# Altium PCB sheet4.PcbDoc (part 1 of 3)
Units mm, origin at the board's own origin, x right, y up, seen from the top; angles counter-clockwise.
Board outline 48.25 x 36 mm, 2 copper layers (Top Layer, Bottom Layer); 112 components, 103 nets, 475 pads, 0 vias.
Unrouted connection lines stored in the file: 312.
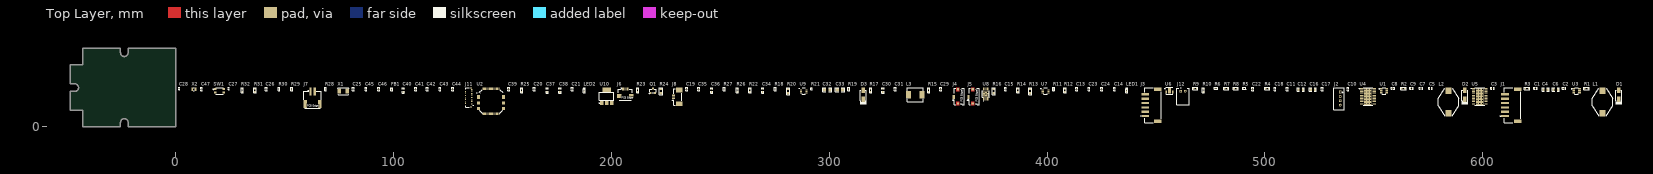
[diagram p0: Top Layer view]
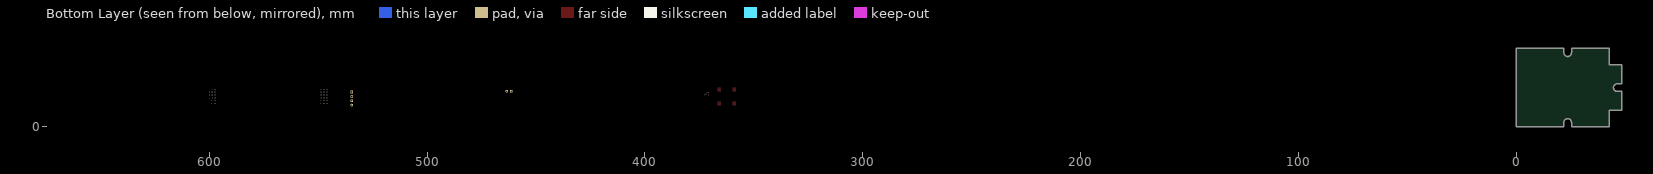
[diagram p1: Bottom Layer view, seen from below]

## Layer stack, top to bottom
Top Solder: solder mask 0.0102, Solder Resist, Dk 3.5
Top Layer: signal copper 0.0356
Dielectric 1: dielectric 0.32, FR-4, Dk 4.8
Bottom Layer: signal copper 0.0356
Bottom Solder: solder mask 0.0102, Solder Resist, Dk 3.5

## Board outline
-48.25,16.25 -46.25,16.25 ccw(c-46.25,18) -46.25,19.75 -48.25,19.75 -48.25,28.5 -42.5,28.5 -42.5,36 -25.25,36 -25.25,34 ccw(c-23.5,34) -21.75,34 -21.75,36 0,36 0,0 -21.75,0 -21.75,2 ccw(c-23.5,2) -25.25,2 -25.25,0 -42.5,0 -42.5,7.5 -48.25,7.5

## Design rules (kind name [scope] priority, off if disabled: settings)
Clearance [All] p1: gap=0.254 ignorepadtopadclearanceinfootprint=FALSE except(0: Arc-Hole Track-Hole SMDPad-Hole THPad-Hole Via-Hole Fill-Hole Poly-Hole Region-Hole Text-Hole)
DiffPairsRouting [All] p1: maxlimit=0.254 minlimit=0.254 mostfreqgap=0.254 toplayer_minwidth=0.381 toplayer_maxwidth=0.381 toplayer_prefwidth=0.381 bottomlayer_minwidth=0.381 bottomlayer_maxwidth=0.381 bottomlayer_prefwidth=0.381 maxuncoupledlength=12.7
MinimumSolderMaskSliver [All] p1 off: minsoldermaskwidth=0.254
PolygonConnect [All] p1: connectstyle=Relief reliefconductorwidth=0.254 reliefentries=4 polygonreliefangle="90 Angle" airgapwidth=0.254
RoomDefinition Sheet4 [InComponentClass('Sheet4')] p1: confinementstyle=ConfineIn formatcopy=TRUE lockcomponents=FALSE outline 1.157,1.524 663.97,1.524 663.97,20.828 1.157,20.828
RoutingVias [All] p1: holewidth=0.711 width=1.27 viastyle="Through Hole" minholewidth=0.711 minwidth=1.27 maxholewidth=0.711 maxwidth=1.27
SilkToSilkClearance [All] p1 off: silktosilkclearance=0.254
SilkToSolderMaskClearance [IsPad] p1 off: minsilkscreentomaskgap=0.254 clearancetoexposedcopper=TRUE
SolderMaskExpansion [All] p1: expansion=0.102 istentingtop=FALSE
Width [All] p1: maxlimit=0.254 minlimit=0.254 preferedwidth=0.254
26 further rules are at their usual default settings.

## Classes and differential pairs
differential pair USB_D: +USB_D_P -USB_D_N

## Components (designator, comment, footprint, x,y, rotation, side; value= is the part's Value field where it differs from the comment)
C1 "0.1uF" Cap-0402 624.092,17.653 r0 top value=100nF
C2 "0.1uF" Cap-0402 637.3,17.653 r0 top value=100nF
C3 "0.1uF" Cap-0402 604.407,17.653 r0 top value=100nF
C4 "22uF" Cap-0805 628.791,17.145 r0 top
C5 "1uF" Cap-0402 575.959,17.653 r0 top
C6 "22uF" Cap-0805 633.49,17.145 r0 top
C7 "1uF" Cap-0402 571.641,17.653 r0 top
C8 "0.1uF" Cap-0402 558.687,17.653 r0 top value=100nF
C9 "47nF" Cap-0402 567.323,17.653 r0 top
C10 "1uF" Cap-0402 538.113,17.272 r90 top
C11 "0.1uF" Cap-0402 510.173,17.272 r90 top value=100nF
C12 "22uF" Cap-0805 516.396,17.145 r0 top
C13 "0.1uF" Cap-0402 413.653,17.272 r90 top value=100nF
C14 "0.1uF" Cap-0402 430.925,17.272 r90 top value=100nF
C15 "0.1uF" Cap-0402 380.887,17.272 r90 top value=100nF
C16 "22uF" Cap-0805 521.984,17.145 r0 top
C17 "0.1uF" Cap-0402 526.302,17.272 r90 top value=100nF
C18 "1uF" Cap-0402 504.585,17.272 r90 top
C19 "0.1uF" Cap-0402 234.583,17.272 r90 top value=100nF
C20 "0.1uF" Cap-0402 164.606,17.272 r90 top value=100nF
C21 "0.1uF" Cap-0402 182.132,17.272 r90 top value=100nF
C22 "47nF" Cap-0402 494.425,17.272 r90 top
C23 "1uF" Cap-0402 419.241,17.272 r90 top
C24 "1uF" Cap-0402 425.083,17.272 r90 top
C25 "22PF" Cap-0402 81.548,17.272 r90 top value=22pF
C26 "22PF" Cap-0402 41.67,17.272 r90 top value=22pF
C27 "10pF" CAP-0201 24.398,17.526 r90 top
C28 "10pF" CAP-0201 1.665,17.526 r90 top
C29 "0.1uF" Cap-0402 351.169,17.272 r90 top value=100nF
C30 "10uF" Cap-0603 324.626,16.764 r90 top
C31 "0.1uF" Cap-0402 330.341,17.272 r90 top value=100nF
C32 "47uF" Cap-1206 299.099,17.018 r0 top
C33 "47uF" Cap-1206 304.941,17.018 r0 top
C34 "18pF" Cap-0603 269.508,16.764 r90 top
C35 "3nF" Cap-0402 240.171,17.272 r90 top
C36 "6.8nF" Cap-0603 246.14,16.764 r90 top
C37 "10uF" Cap-0603 170.575,16.764 r90 top
C38 "10uF" Cap-0603 176.417,16.764 r90 top
C39 "0.1uF" Cap-0402 152.922,17.272 r90 top value=100nF
C40 "10uF" Cap-0603 104.535,16.764 r90 top
C41 "0.1uF" Cap-0402 110.25,17.272 r90 top value=100nF
C42 "0.1uF" Cap-0402 115.584,17.272 r90 top value=100nF
C43 "0.1uF" Cap-0402 121.426,17.272 r90 top value=100nF
C44 "0.1uF" Cap-0402 127.268,17.272 r90 top value=100nF
C45 "1uF" Cap-0402 87.39,17.272 r90 top
C46 "0.1uF" Cap-0402 93.232,17.272 r90 top value=100nF
C47 "0.1uF" Cap-0402 11.952,17.272 r90 top value=100nF
D1 "SS34" SMA 662.319,14.732 r90 top
D2 "SS34" SMA 591.707,14.732 r90 top
D3 "SS36" SMA 315.609,14.732 r90 top
FB1 "BLM15PD121SN1D" IND-0402 99.201,17.272 r90 top
J1 "S6B-PH-SM4-TB(LF)(SN)" S6B-PH-SM4-TB(LF)(SN) 613.043,9.906 r90 top
J2 "440054-4" 440054-4 534.557,12.954 r90 top
J3 "S6B-PH-SM4-TB(LF)(SN)" S6B-PH-SM4-TB(LF)(SN) 447.943,9.906 r90 top
J4 "54548-0571" 54548-0571 359.043,10.668 r90 top
J5 "54548-0571" 54548-0571 365.901,10.668 r90 top
J6 "0.5-6PQFHY-H1.0 119" "0.5-6PQFHY-H1.0 119" 206.389,15.748 r0 top
J7 "WAFER-PH2.0-2PWB" WAFER-PH2.0-2PWB 62.879,13.335 r0 top
J8 "0533980271" 0533980271 231.281,10.541 r90 top
J11 "FH26W-25S-0.3SHW(60)" FH26W-25S-0.3SHW(60) 134.507,13.462 r90 top
J12 "S2B-PH-K-S(LF)(SN)" S2B-PH-K-S(LF)(SN) 461.405,16.383 r0 top
L1 "22uH" SSL0804T-220M-N 654.826,11.43 r90 top
L2 "22uH" SSL0804T-220M-N 584.214,11.43 r90 top
L3 "6.8uH" 0630CDMCCDS_6R8MC 339.485,14.732 r0 top
LED1 "Green" LED-0402 436.513,16.51 r90 top
LED2 "Red" LED-0402 187.593,16.51 r90 top
Q1 "NSS40201LT1G" SOT-23 219.089,16.51 r0 top
R1 "100K" Res-0603 647.587,17.526 r0 top
R2 "100K" Res-0603 563.513,17.526 r0 top
R3 "5.1K" Res-0603 620.282,17.526 r0 top
R4 "5.1K" Res-0603 501.029,17.526 r0 top
R5 "10K" Res-0402 490.488,17.653 r0 top
R6 "10K" Res-0402 477.534,17.653 r0 top
R7 "1.5K" Res-0603 482.233,17.526 r0 top value=1.5kR
R8 "1.5K" Res-0603 486.551,17.526 r0 top value=1.5kR
R9 "1.5K" Res-0603 468.009,17.526 r0 top value=1.5kR
R10 "1.5K" Res-0603 471.692,16.764 r90 top value=1.5kR
R11 "1K" Res-0402 402.985,17.272 r90 top
R12 "6.2K" Res-0603 408.192,16.764 r90 top value=6.2kR
R13 "10R" RES-0805 392.317,16.383 r90 top
R14 "0.1R" Res-0603 386.602,16.764 r90 top value=100mR
R15 "200K" Res-0603 345.708,16.764 r90 top
R16 "10R" RES-0805 375.553,16.383 r90 top
R17 "68K" Res-0603 319.038,16.764 r90 top
R18 "47R" Res-0402 275.223,17.272 r90 top
R19 "51K" Res-0402 309.005,17.272 r90 top value=51kR
R20 "10R" RES-0805 281.192,16.383 r90 top
R21 "23.7K" Res-0201 291.86,17.526 r90 top value=23.7kR
R22 "0.1R" Res-0603 263.666,16.764 r90 top value=100mR
R23 "100R" Res-0603 212.104,16.764 r90 top
R24 "10R" RES-0805 222.772,16.383 r90 top
R25 "330R" Res-0603 158.891,16.764 r90 top
R26 "169k" Res-0603 257.824,16.764 r90 top
R27 "10K" Res-0402 251.855,17.272 r90 top
R28 "806R" Res-0402 68.848,17.272 r90 top
R29 "10K" Res-0402 53.354,17.272 r90 top
R30 "10K" Res-0402 47.512,17.272 r90 top
R31 "DNP" Res-0603 36.463,16.764 r90 top
R32 "DNP" Res-0603 30.621,16.764 r90 top
SW1 "TS-1185EC-C-D-B" TS-1185EC-C-D-B_ 20.207,16.51 r0 top
U1 "MT3608" SOT-23-6 554.623,16.51 r0 top
U2 "STM32F103RCT6" "64-LQFP (10x10)" 144.794,11.684 r0 top
U3 "MT3608" SOT-23-6 643.015,16.51 r0 top
U4 "DRV8873HPWPRQ1" HTSSOP-24-EP 547.257,13.97 r0 top
U5 "DRV8873HPWPRQ1" HTSSOP-24-EP 598.565,13.97 r0 top
U6 "MCP73213-A6SI/MF" TDFN-10-EP(3x3) 456.198,16.51 r0 top
U7 "INA219AIDCNR" SOT-23-8 399.302,16.51 r0 top
U8 "TPS54240DGQR" 10-HVSSOP 371.87,15.113 r90 top
U9 "INA219AIDCNR" SOT-23-8 288.304,16.51 r0 top
U10 "AMS1117-3.3" "SOT- 223" 197.88,13.97 r0 top
X1 "8MHz" SMD5032-2P 76.976,16.383 r0 top
X2 "32.768KHZ" "2-SMD, (2.00mm x 1.20mm)" 8.396,17.272 r0 top

## Footprints (in the part's own frame and the unit in brackets; to place one, negate y for a bottom-side part, rotate by r counter-clockwise, add the part's x,y. Pads: shape width x height; smd on the part's side, far side on the other; paste and mask are expansions set on the pad)
"0.5-6PQFHY-H1.0 119" [mm]
  rect 0.3x1.2 smd: 1(-1.25,1.625) 2(-0.75,1.625) 3(-0.25,1.625) 4(0.25,1.625) 5(0.75,1.625) 6(1.25,1.625)
  rect 2x1.8 smd: MP1(-2.75,-1.625) MP2(2.75,-1.625)
  silkscreen extent -3.3,-3.45 3.3,2.13, body extent -3.25,-3.43 3.25,2.26, height 1.2
"2-SMD, (2.00mm x 1.20mm)" [mm]
  rect 0.8x1.5 smd: 1(-0.75,0) 2(0.75,0)
  silkscreen extent -0.15,-0.66 0.18,0.66, body extent -1,-0.6 1,0.6, height 0.35
10-HVSSOP [mm] "IC BATT CHG LI-ION 1CELL 10MSOP"
  rect 1.45x0.3 smd: 1(-2.2,1) 2(-2.2,0.5) 3(-2.2,0) 4(-2.2,-0.5) 5(-2.2,-1) 6(2.2,-1) 7(2.2,-0.5) 8(2.2,0) 9(2.2,0.5) 10(2.2,1)
  round 0.45 hole 0.3: 11(-0.6,0.9) 11(-0.6,-0.9) 11(0,0) 11(0.6,0.9) 11(0.6,-0.9)
  rect 2.2x3.1 smd: 11(0,0)
  silkscreen extent -3.23,-1.64 1.48,1.64, body extent -2.45,-1.5 2.45,1.5, height 1.1
"64-LQFP (10x10)" [mm]
  rect 1.2x0.3 smd: 1(-5.75,3.75) 2(-5.75,3.25) 3(-5.75,2.75) 4(-5.75,2.25) 5(-5.75,1.75) 6(-5.75,1.25) 7(-5.75,0.75) 8(-5.75,0.25) 9(-5.75,-0.25) 10(-5.75,-0.75) 11(-5.75,-1.25) 12(-5.75,-1.75) 13(-5.75,-2.25) 14(-5.75,-2.75) 15(-5.75,-3.25) 16(-5.75,-3.75) 33(5.75,-3.75) 34(5.75,-3.25) 35(5.75,-2.75) 36(5.75,-2.25) 37(5.75,-1.75) 38(5.75,-1.25) 39(5.75,-0.75) 40(5.75,-0.25) 41(5.75,0.25) 42(5.75,0.75) 43(5.75,1.25) 44(5.75,1.75) 45(5.75,2.25) 46(5.75,2.75) 47(5.75,3.25) 48(5.75,3.75)
  rect 0.3x1.2 smd: 17(-3.75,-5.75) 18(-3.25,-5.75) 19(-2.75,-5.75) 20(-2.25,-5.75) 21(-1.75,-5.75) 22(-1.25,-5.75) 23(-0.75,-5.75) 24(-0.25,-5.75) 25(0.25,-5.75) 26(0.75,-5.75) 27(1.25,-5.75) 28(1.75,-5.75) 29(2.25,-5.75) 30(2.75,-5.75) 31(3.25,-5.75) 32(3.75,-5.75) 49(3.75,5.75) 50(3.25,5.75) 51(2.75,5.75) 52(2.25,5.75) 53(1.75,5.75) 54(1.25,5.75) 55(0.75,5.75) 56(0.25,5.75) 57(-0.25,5.75) 58(-0.75,5.75) 59(-1.25,5.75) 60(-1.75,5.75) 61(-2.25,5.75) 62(-2.75,5.75) 63(-3.25,5.75) 64(-3.75,5.75)
  silkscreen extent -6.63,-5.36 5.28,5.36, body extent -6,-6 6,6, height 1.6
0630CDMCCDS_6R8MC [mm]
  rect 2.35x3.5 smd: 1(-3.025,0) 2(3.025,0)
  silkscreen extent -3.71,-3.3 3.71,3.3, body extent -3.65,-3.3 3.65,3.3, height 3
54548-0571 [mm]
  rect 0.3x1 smd: 1(2.275,1.9) 2(2.775,1.9) 3(3.275,1.9) 4(3.775,1.9) 5(4.275,1.9)
  rect 1x1 smd: MP1(0,0) MP2(6.55,0)
  Top Layer region: 7.375,0.65 5.725,0.65 5.725,-0.65 7.375,-0.65
  Top Layer region: -0.825,0.65 0.825,0.65 0.825,-0.65 -0.825,-0.65
  silkscreen extent -0.58,-2.9 7.12,2.44, body extent -0.58,-2.9 7.12,2.1, height 1.21
440054-4 [mm]
  rect 1.3x1.3 hole 0.8: 1(3,0)
  round 1.3 hole 0.8: 2(1,0) 3(-1,0) 4(-3,0)
  silkscreen extent -5.05,-1.77 5.05,3.05, body extent -5,-1.72 5,2.99, height 6.35
0533980271 [mm]
  rect 0.8x1.3 smd: 1(2.55,2.75) 2(3.8,2.75)
  rect 2.1x3 smd: MP1(0,0) MP2(6.35,0)
  silkscreen extent -0.65,-1.1 7,3.23, body extent -0.65,-1.11 7,3.09, height 4.72
CAP-0201 [mm]
  rect 0.3x0.3 smd mask+0.055: 1(-0.3,0) 2(0.3,0)
  silkscreen extent -0.53,-0.23 0.53,0.23, body extent -0.3,-0.15 0.3,0.15, height 0.28
Cap-0402 [mil]
  rect 18x25 smd mask+2.36: 1(-18.5,0) 2(18.5,0)
  silkscreen extent -31,-16 31,16, body extent -20,-10 20,10, height 19
Cap-0603 [mil]
  rect 30x35 smd mask+2.36: 1(-30,0) 2(30,0)
  silkscreen extent -49,-21 49,21, body extent -32,-16 31,16, height 34
Cap-0805 [mil] "SMD 0805"
  rect 40x60 smd mask+2.76: 1(-40,0) 2(40,0)
  silkscreen extent -64,-34 64,34, body extent -39,-25 39,25, height 30
Cap-1206 [mil] "SMD 1206"
  rect 60x70 smd: 1(-50,0) 2(50,0)
  silkscreen extent -84,-39 84,39, body extent -63,-31 63,32, height 39
FH26W-25S-0.3SHW(60) [mm]
  rect 0.3x0.8 smd paste-1: 1(-3.6,-1.438) 3(-3,-1.438) 5(-2.4,-1.438) 7(-1.8,-1.438) 9(-1.2,-1.438) 11(-0.6,-1.438) 13(0,-1.438) 15(0.6,-1.438) 17(1.2,-1.438) 19(1.8,-1.438) 21(2.4,-1.438) 23(3,-1.438) 25(3.6,-1.438)
  rect 0.3x0.65 smd paste-1: 2(-3.3,1.438) 4(-2.7,1.438) 6(-2.1,1.438) 8(-1.5,1.438) 10(-0.9,1.438) 12(-0.3,1.438) 14(0.3,1.438) 16(0.9,1.438) 18(1.5,1.438) 20(2.1,1.438) 22(2.7,1.438) 24(3.3,1.438)
  rect 0.4x0.95 smd paste-1: MP1(-4.3,-1.162) MP2(4.3,-1.162)
  silkscreen extent -4.5,-2.18 4.5,1.31, body extent -4.5,-1.78 4.5,1.72, height 0.97
HTSSOP-24-EP [mm]
  rect 1.57x0.41 smd: 1(-2.87,3.575) 2(-2.87,2.925) 3(-2.87,2.275) 4(-2.87,1.625) 5(-2.87,0.975) 6(-2.87,0.325) 7(-2.87,-0.325) 8(-2.87,-0.975) 9(-2.87,-1.625) 10(-2.87,-2.275) 11(-2.87,-2.925) 12(-2.87,-3.575) 13(2.87,-3.575) 14(2.87,-2.925) 15(2.87,-2.275) 16(2.87,-1.625) 17(2.87,-0.975) 18(2.87,-0.325) 19(2.87,0.325) 20(2.87,0.975) 21(2.87,1.625) 22(2.87,2.275) 23(2.87,2.925) 24(2.87,3.575)
  rect 3.4x7.8 smd: 25(0,0)
  round 0.5 hole 0.3: P1(-1.3,3.25) P2(0,3.25) P3(1.3,3.25) P4(-1.3,1.95) P5(0,1.95) P6(1.3,1.95) P7(-1.3,0.65) P8(0,0.65) P9(1.3,0.65) P10(-1.3,-0.65) P11(0,-0.65) P12(1.3,-0.65) P13(-1.3,-1.95) P14(0,-1.95) P15(1.3,-1.95) P16(-1.3,-3.25) P17(0,-3.25) P18(1.3,-3.25)
  silkscreen extent -3.94,-4.05 2.25,4.05, body extent -3.2,-3.9 3.2,3.9, height 1.2
IND-0402 [mm]
  rect 0.4x0.6 smd: 1(-0.35,0) 2(0.35,0)
  silkscreen extent -0.71,-0.46 0.71,0.46, body extent -0.5,-0.25 0.5,0.25, height 0.25
LED-0402 [mm]
  rect 0.62x0.72 smd: 1(-0.475,0) 2(0.475,0)
  silkscreen extent -0.89,-0.51 1.55,0.51, body extent -0.5,-0.25 0.51,0.25, height 0.45
Res-0201 [mm]
  rect 0.27x0.37 smd mask+0.055: 1(-0.275,0) 2(0.275,0)
  silkscreen extent -0.48,-0.25 0.48,0.25, body extent -0.3,-0.15 0.3,0.15, height 0.29
Res-0402 [mil]
  rect 18x25 smd mask+2.17: 1(-18.5,0) 2(18.5,0)
  silkscreen extent -32,-17 32,16, body extent -23,-11 23,11, height 16
Res-0603 [mil]
  rect 30x35 smd: 1(-30,0) 2(30,0)
  silkscreen extent -48,-21 48,21, body extent -31,-17 31,17, height 18
RES-0805 [mil] "SMD 0805"
  rect 40x50 smd: 1(-40,0) 2(40,0)
  silkscreen extent -64,-29 64,29, body extent -39,-25 39,24, height 24
S2B-PH-K-S(LF)(SN) [mm]
  rect 1.2x1.2 hole 0.7: 1(0,0)
  round 1.2 hole 0.7: 2(2,0)
  silkscreen extent -1.95,-6.25 3.95,1.57, body extent -1.95,-6.25 3.95,1.35, height 4.8
S6B-PH-SM4-TB(LF)(SN) [mm]
  rect 1x3.5 smd: 1(-5,2.875) 2(-3,2.875) 3(-1,2.875) 4(1,2.875) 5(3,2.875) 6(5,2.875)
  rect 1.5x3.4 smd: MP1(-7.35,-2.875) MP2(7.35,-2.875)
  silkscreen extent -7.95,-4.37 7.95,5, body extent -7.95,-4.38 7.95,4.22, height 5.6
SMA [mm]
  rect 2.5x1.7 smd: 1(-2,0) 2(2,0)
  silkscreen extent -4.45,-1.42 2.06,1.42, body extent -2.6,-1.3 2.6,1.3, height 2.4
SMD5032-2P [mm]
  rect 1.7x2.4 smd: 1(-1.85,0) 2(1.85,0)
  silkscreen extent -2.51,-1.65 2.51,1.65, body extent -2.5,-1.6 2.5,1.6, height 1.3
SOT-23 [mm] "TRANS NPN 40V 0.6A SOT23"
  rect 0.82x0.92 smd: 1(-0.95,-1) 2(0.95,-1) 3(0,1)
  silkscreen extent -1.68,-1.3 1.55,0.81, body extent -1.5,-1.25 1.5,1.25, height 1.05
SOT-23-6 [mm]
  rect 1.22x0.62 smd: 1(-1.31,0.95) 2(-1.31,0) 3(-1.31,-0.95) 4(1.31,-0.95) 5(1.31,0) 6(1.31,0.95)
  silkscreen extent -2.18,-1.52 0.86,1.52, body extent -1.5,-1.5 1.5,1.5, height 1.47
SOT-23-8 [mm]
  rect 1x0.4 smd: 1(-1.295,0.975) 2(-1.295,0.325) 3(-1.295,-0.325) 4(-1.295,-0.975) 5(1.295,-0.975) 6(1.295,-0.325) 7(1.295,0.325) 8(1.295,0.975)
  silkscreen extent -2.11,-1.5 0.76,1.5, body extent -1.48,-1.45 1.48,1.45, height 1.1
"SOT- 223" [mm]
  rect 1.5x2 smd: 1(-2.3,-3.05) 2(0,-3.05) 3(2.3,-3.05)
  rect 3.8x2 smd: 4(0,3.05)
  silkscreen extent -3.35,-3.2 3.3,1.8, body extent -3.25,-3.5 3.25,3.5, height 1.61
SSL0804T-220M-N [mm]
  rect 2.92x2.79 smd: 1(-5.145,0) 2(5.145,0)
  silkscreen extent -6.27,-4.7 6.27,4.7, body extent -6.48,-4.7 6.48,4.7, height 4.9
TDFN-10-EP(3x3) [mm]
  rect 0.65x0.3 smd: 1(-1.55,1) 2(-1.55,0.5) 3(-1.55,0) 4(-1.55,-0.5) 5(-1.55,-1) 6(1.55,-1) 7(1.55,-0.5) 8(1.55,0) 9(1.55,0.5) 10(1.55,1)
  rect 1.55x2.48 smd: 11(0,0)
  silkscreen extent -2.16,-1.55 1.55,1.55, body extent -1.5,-1.5 1.5,1.5, height 1
TS-1185EC-C-D-B_ [mm]
  rect 1.25x0.9 smd: 1(-1.925,0.75) 1(1.925,0.75) 2(-1.925,-0.75) 2(1.925,-0.75)
  silkscreen extent -2.84,-1.52 1.78,1.52, body extent -2.33,-1.5 2.32,1.5, height 2
WAFER-PH2.0-2PWB [mm]
  rect 1x3.5 smd: 1(-1,2.85) 2(1,2.85)
  rect 1.5x3.5 smd: MP1(-3.35,-2.85) MP2(3.35,-2.85)
  silkscreen extent -4.09,-4.85 4.04,3.56, body extent -4.03,-4.8 3.97,3.7, height 5.59

## Part data
C1 C2 C3 C8 C11 C13 C14 C15 C17 C19 C20 C21 C29 C31 C39 C41 C42 C43 C44 C46 C47: library part GRM155R71C104KA88D, "CAP CER 0.1UF 16V X7R 0402", Case Code (Imperial)=0402, Case Code (Metric)=1005, Dielectric=X7R, Dielectric Material=Ceramic, Insulation Resistance=10GR, LCSC Part Number=C71629, Manufacturer=Murata, Max Operating Temperature=125°C, Min Operating Temperature=-55°C, Package Quantity=1, Tolerance=10%, Voltage=16V, Case/Package=0402, Category="Ceramic Capacitors", ComponentLink1Description=https://datasheet.ciiva.com/129/grm155r71c104ka88-01-129739.pdf?src-supplier=Digi-Key, ComponentLink1URL=https://datasheet.ciiva.com/129/grm155r71c104ka88-01-129739.pdf?src-supplier=Digi-Key, ComponentLink2Description=https://datasheet.ciiva.com/129/grm155r71c104ka88-01-129740.pdf?src-supplier=Digi-Key, ComponentLink2URL=https://datasheet.ciiva.com/129/grm155r71c104ka88-01-129740.pdf?src-supplier=Digi-Key, ComponentLink3Description=https://datasheet.ciiva.com/18102/getdatasheetpartid-85307-18102905.pdf?src-supplier=Verical, ComponentLink3URL=https://datasheet.ciiva.com/18102/getdatasheetpartid-85307-18102905.pdf?src-supplier=Verical, ComponentLink4Description=https://datasheet.ciiva.com/29199/454098-da-01-en-vs-kondensator-0402-29199799.pdf?src-supplier=Conrad, ComponentLink4URL=https://datasheet.ciiva.com/29199/454098-da-01-en-vs-kondensator-0402-29199799.pdf?src-supplier=Conrad, ComponentLink5Description=https://datasheet.ciiva.com/7937/4360-7937615.pdf?src-supplier=Element14, ComponentLink5URL=https://datasheet.ciiva.com/7937/4360-7937615.pdf?src-supplier=Element14, ComponentLink6Description=https://datasheet.ciiva.com/14116/grmseries-highdielectrictype-eng-14116878.pdf?src-supplier=Distrelec, ComponentLink6URL=https://datasheet.ciiva.com/14116/grmseries-highdielectrictype-eng-14116878.pdf?src-supplier=Distrelec, ComponentLink7Description=https://datasheet.ciiva.com/14103/grmseries-highdielectrictype-eng-14103750.pdf?src-supplier=Distrelec, ComponentLink7URL=https://datasheet.ciiva.com/14103/grmseries-highdielectrictype-eng-14103750.pdf?src-supplier=Distrelec, ComponentLink8Description=https://datasheet.ciiva.com/28534/4360-28534127.pdf?src-supplier=Element14, ComponentLink8URL=https://datasheet.ciiva.com/28534/4360-28534127.pdf?src-supplier=Element14, ComponentLink9Description=https://datasheet.ciiva.com/28534/4360-28534133.pdf?src-supplier=Element14, ComponentLink9URL=https://datasheet.ciiva.com/28534/4360-28534133.pdf?src-supplier=Element14, ComponentLink10Description=https://datasheet.ciiva.com/16199/product-16199000.pdf?src-supplier=Future+Electronics, ComponentLink10URL=https://datasheet.ciiva.com/16199/product-16199000.pdf?src-supplier=Future+Electronics, Depth=0.5mm, Height=0.5mm, Item Type=Capacitor, Lead Free="Lead Free", Length=1mm, Manufacturer Part Number=GRM155R71C104KA88D, Material=Ceramic, Mounting Technology="Surface Mount", Packaging="Tape and Reel", Pins=2, Pricing 1="10000=0.00480, 30000=0.00470, 100000=0.00350, 250000=0.00330 (USD)", Radiation Hardening=No, RoHS=Yes, RoHS Compliant=Yes, Series=GRM, Stock 1=1690322, Supplier 1="Arrow Electronics", Supplier Part Number 1=GRM155R71C104KA88D, Termination=SMD/SMT, Thickness=0.022inch, Voltage Rating=16V, Voltage Rating (DC)=16V, Width=0.02inch
C4 C6 C12 C16: library part CC0805MKX5R8BB226, "CAP CER 22UF 25V X5R 0805", Case Code (Imperial)=0805, Case Code (Metric)=2012, Dielectric=X5R, LCSC Part Number=C784585, Manufacturer=Yageo, Max Operating Temperature=85°C, Min Operating Temperature=-55°C, Package Quantity=3000, Supplier Part Number 1=311-1903-1-ND, Tolerance=20%, Voltage Rating=25V, Capacitance=22uF, Case/Package=0805, Category="Ceramic Capacitors", ComponentLink1Description=http://www.mouser.com/ds/2/447/Yageo_UPY-GP_NP0_16V-to-50V_9-358835.pdf?src-supplier=Mouser, ComponentLink1URL=http://www.mouser.com/ds/2/447/Yageo_UPY-GP_NP0_16V-to-50V_9-358835.pdf?src-supplier=Mouser, ComponentLink2Description=http://www.yageo.com/documents/recent/UPY-GPHC_X5R_4V-to-50V_25.pdf?src-supplier=Digi-Key, ComponentLink2URL=http://www.yageo.com/documents/recent/UPY-GPHC_X5R_4V-to-50V_25.pdf?src-supplier=Digi-Key, Halogen Free="Halogen Free", Height=1.25mm, Item Type=Capacitor, Lead Free="Lead Free", Length=0.079inch, Manufacturer Part Number=CC0805MKX5R8BB226, Mount="Surface Mount", Packaging="Tape and Reel", Pricing 1="1=0.47000, 10=0.33300, 50=0.25140, 100=0.21900, 500=0.16222, 1000=0.13789 (USD)", RoHS=Yes, RoHS Compliant=Yes, Stock 1=64970, Supplier 1=Digi-Key, Termination=SMD/SMT, Thickness=0.057inch, Voltage Rating (DC)=25V, Weight=0.000194oz, Width=0.049inch
C5 C7 C10 C18 C23 C24 C45: library part CC0402KRX5R7BB105, "CAP CER 1UF 16V X5R 0402", Case Code (Imperial)=0402, Case Code (Metric)=1005, Dielectric=X5R, LCSC Part Number=C325464, Manufacturer=Yageo, Max Operating Temperature=85°C, Min Operating Temperature=-55°C, Supplier Part Number 1=311-1691-6-ND, Tolerance=10%, Voltage Rating=16V, Capacitance=1uF, Case/Package=0402, ComponentLink1Description=http://www.yageo.com/documents/recent/UPY-GPHC_X5R_4V-to-50V_12.pdf?src-supplier=Avnet+Europe, ComponentLink1URL=http://www.yageo.com/documents/recent/UPY-GPHC_X5R_4V-to-50V_12.pdf?src-supplier=Avnet+Europe, Composition=Ceramic, Depth=0.5mm, Halogen Free="Halogen Free", Height=0.5mm, Item Type=Capacitor, Lead Free="Lead Free", Length=1mm, Manufacturer Part Number=CC0402KRX5R7BB105, Mount="Surface Mount", Packaging="Tape and Reel", Pricing 1="1=0.36, 10=0.252, 100=0.1512, 500=0.1134, 1000=0.09576, 2500=0.09072, 5000=0.08568 (USD)", Radiation Hardening=No, Stock 1=1405667, Supplier 1=Digi-Key, Termination=SMD/SMT, Thickness=0.022inch, Voltage Rating (DC)=16V, Weight=2.3E-05oz, Width=0.02inch
C9 C22: library part GRM155R71E473KA88D, "CAP CER 0.047UF 25V X7R 0402", Case Code (Imperial)=0402, Case Code (Metric)=1005, Dielectric=X7R, LCSC Part Number=C77017, Manufacturer=Murata, Max Operating Temperature=125°C, Min Operating Temperature=-55°C, Package Quantity=1, Supplier Part Number 1=2478015P, Tolerance=10%, Voltage=25V, Case/Package=0402, Category="Ceramic Capacitors", ComponentLink1Description=https://datasheet.ciiva.com/34302/1856425-34302854.pdf?src-supplier=Jameco, ComponentLink1URL=https://datasheet.ciiva.com/34302/1856425-34302854.pdf?src-supplier=Jameco, ComponentLink2Description=https://datasheet.ciiva.com/131/grm155r71e473ka88-01-131494.pdf?src-supplier=Digi-Key, ComponentLink2URL=https://datasheet.ciiva.com/131/grm155r71e473ka88-01-131494.pdf?src-supplier=Digi-Key, ComponentLink3Description=https://datasheet.ciiva.com/18184/getdatasheetpartid-153136-18184712.pdf?src-supplier=Verical, ComponentLink3URL=https://datasheet.ciiva.com/18184/getdatasheetpartid-153136-18184712.pdf?src-supplier=Verical, ComponentLink4Description=https://datasheet.ciiva.com/29199/454180-da-01-en-vs-kondensator-0402-29199826.pdf?src-supplier=Conrad, ComponentLink4URL=https://datasheet.ciiva.com/29199/454180-da-01-en-vs-kondensator-0402-29199826.pdf?src-supplier=Conrad, ComponentLink5Description=https://datasheet.ciiva.com/14103/grmseries-highdielectrictype-eng-14103754.pdf?src-supplier=Distrelec, ComponentLink5URL=https://datasheet.ciiva.com/14103/grmseries-highdielectrictype-eng-14103754.pdf?src-supplier=Distrelec, ComponentLink6Description=https://datasheet.ciiva.com/7937/608985-7937623.pdf?src-supplier=Element14, ComponentLink6URL=https://datasheet.ciiva.com/7937/608985-7937623.pdf?src-supplier=Element14, ComponentLink7Description=https://datasheet.ciiva.com/131/grm155r71e473ka88-01-131493.pdf?src-supplier=Digi-Key, ComponentLink7URL=https://datasheet.ciiva.com/131/grm155r71e473ka88-01-131493.pdf?src-supplier=Digi-Key, ComponentLink8Description=https://datasheet.ciiva.com/131/grm155r71e473ka88-01-131492.pdf?src-supplier=Digi-Key, ComponentLink8URL=https://datasheet.ciiva.com/131/grm155r71e473ka88-01-131492.pdf?src-supplier=Digi-Key, ComponentLink9Description=https://datasheet.ciiva.com/5424/product-5424844.pdf?src-supplier=Mouser, ComponentLink9URL=https://datasheet.ciiva.com/5424/product-5424844.pdf?src-supplier=Mouser, ComponentLink10Description=https://datasheet.ciiva.com/2989/product-2989395.pdf?src-supplier=Avnet, ComponentLink10URL=https://datasheet.ciiva.com/2989/product-2989395.pdf?src-supplier=Avnet, ComponentLink11Description=https://datasheet.ciiva.com/16213/product-16213823.pdf?src-supplier=Future+Electronics, ComponentLink11URL=https://datasheet.ciiva.com/16213/product-16213823.pdf?src-supplier=Future+Electronics, Construction=Flat, Depth=0.5mm, Height=0.5mm, Item Type=Capacitor, Lead Free="Lead Free", Length=1mm, Manufacturer Part Number=GRM155R71E473KA88D, Material=Ceramic, Mounting Technology="Surface Mount", Packaging="Tape and Reel", Pins=2, Pricing 1="1000=0.00007, 8000=0.00900 (GBP)", Radiation Hardening=No, Reach SVHC Compliant=Yes, RoHS=Yes, RoHS Compliant=Yes, Series=GRM, Stock 1=10000, Supplier 1=Rs, Termination=SMD/SMT, Thickness=0.022inch, Voltage Rating=25V, Voltage Rating (DC)=25V, Width=0.02inch
C25 C26: library part CC0402JRNPO9BN220, "CAP CER 22PF 50V C0G/NPO 0402", Case Code (Imperial)=0402, Case Code (Metric)=1005, Dielectric=C0G, Dielectric Material=Ceramic, Insulation Resistance=100GR, LCSC Part Number=C106203, Manufacturer=Yageo, Max Operating Temperature=125°C, Min Operating Temperature=-55°C, Package Quantity=1, Supplier Part Number 1=9105957, Temperature Coefficient=30ppm/°C, Tolerance=5%, Voltage=50V, Case/Package=0402, Category="Ceramic Capacitors", ComponentLink1Description=https://datasheet.ciiva.com/5789/1443161-5789509.pdf?src-supplier=Farnell, ComponentLink1URL=https://datasheet.ciiva.com/5789/1443161-5789509.pdf?src-supplier=Farnell, ComponentLink2Description=https://datasheet.ciiva.com/8033/1443161-8033606.pdf?src-supplier=Element14, ComponentLink2URL=https://datasheet.ciiva.com/8033/1443161-8033606.pdf?src-supplier=Element14, ComponentLink3Description=https://datasheet.ciiva.com/7656/1132289-7656615.pdf?src-supplier=Element14, ComponentLink3URL=https://datasheet.ciiva.com/7656/1132289-7656615.pdf?src-supplier=Element14, ComponentLink4Description=https://datasheet.ciiva.com/8033/1443161-8033607.pdf?src-supplier=Element14, ComponentLink4URL=https://datasheet.ciiva.com/8033/1443161-8033607.pdf?src-supplier=Element14, ComponentLink5Description=https://datasheet.ciiva.com/8033/1443161-8033605.pdf?src-supplier=Element14, ComponentLink5URL=https://datasheet.ciiva.com/8033/1443161-8033605.pdf?src-supplier=Element14, ComponentLink6Description=https://datasheet.ciiva.com/143/mlccorderingcode-143987.pdf?src-supplier=Digi-Key, ComponentLink6URL=https://datasheet.ciiva.com/143/mlccorderingcode-143987.pdf?src-supplier=Digi-Key, ComponentLink7Description=https://datasheet.ciiva.com/143/mlccorderingcode-143986.pdf?src-supplier=Digi-Key, ComponentLink7URL=https://datasheet.ciiva.com/143/mlccorderingcode-143986.pdf?src-supplier=Digi-Key, ComponentLink8Description=https://datasheet.ciiva.com/143/mlccorderingcode-143988.pdf?src-supplier=Digi-Key, ComponentLink8URL=https://datasheet.ciiva.com/143/mlccorderingcode-143988.pdf?src-supplier=Digi-Key, ComponentLink9Description=https://datasheet.ciiva.com/5425/upy-gp-np0-16v-to-50v-8-5425483.pdf?src-supplier=Mouser, ComponentLink9URL=https://datasheet.ciiva.com/5425/upy-gp-np0-16v-to-50v-8-5425483.pdf?src-supplier=Mouser, ComponentLink10Description=https://datasheet.ciiva.com/15189/getdatasheetpartid-370074-15189117.pdf?src-supplier=Verical, ComponentLink10URL=https://datasheet.ciiva.com/15189/getdatasheetpartid-370074-15189117.pdf?src-supplier=Verical, Depth=0.5mm, Height=0.5mm, Item Type=Capacitor, Lead Free="Lead Free", Length=1mm, Manufacturer Part Number=CC0402JRNPO9BN220, Mounting Technology="Surface Mount", Packaging="Tape and Reel", Pins=2, Pricing 1="10000=0.00220, 40000=0.00210, 150000=0.00200, 400000=0.00190, 1000000=0.00180 (USD)", Radiation Hardening=No, Reach SVHC Compliant=Yes, Resistor Type=Ceramic, RoHS=Yes, RoHS Compliant=Yes, Series=CC, Stock 1=200000, Supplier 1="Future Electronics", Termination=SMD/SMT, Thickness=0.022inch, Voltage Rating=50V, Voltage Rating (DC)=50V, Width=0.02inch
C27 C28: library part CGA1A2C0G1E100D030BA, "CAP CER 10PF 25V C0G 0201", Case Code (Imperial)=0201, Case Code (Metric)=0603, Dielectric=C0G, LCSC Part Number=C2168728, Manufacturer=TDK, Max Operating Temperature=125°C, Min Operating Temperature=-55°C, Package Quantity=1, Ratings=AEC-Q200, Resistor Type=Ceramic, Supplier Part Number 1=445-9023-1-ND, Voltage Rating=25V, Capacitance=10pF, Case/Package=0201, Category="Ceramic Capacitors", ComponentLink1Description=https://datasheet.ciiva.com/24220/cga1a2c0g1e100d030ba-271838-24220873.pdf?src-supplier=Mouser, ComponentLink1URL=https://datasheet.ciiva.com/24220/cga1a2c0g1e100d030ba-271838-24220873.pdf?src-supplier=Mouser, Depth=0.3mm, Height=0.3mm, Length=0.6mm, Manufacturer Part Number=CGA1A2C0G1E100D030BA, Mount="Surface Mount", Packaging="Tape and Reel", Pricing 1="1=0.11000, 10=0.07900, 50=0.04340, 100=0.03540, 500=0.02530, 1000=0.01987, 2500=0.01807, 5000=0.01662 (USD)", RoHS=Yes, RoHS Compliant=Yes, Series=CGA, Stock 1=28695, Supplier 1=Digi-Key, Termination=SMD/SMT, Thickness=0.013inch, Voltage Rating (DC)=25V, Weight=6E-06oz, Width=0.3mm
C30 C37 C38 C40: library part CC0603KRX5R7BB106, "CAP CER 10UF 16V X5R 0603", Case Code (Imperial)=0603, Case Code (Metric)=1608, LCSC Part Number=C2936601, Manufacturer=Yageo, Max Operating Temperature=85°C, Min Operating Temperature=-55°C, Supplier Part Number 1=311-3486-1-ND, Tolerance=10%, Voltage Rating=16V, Capacitance=10uF, Case/Package=0603, Category="Ceramic Capacitors", ComponentLink1Description=http://www.yageo.com/documents/recent/UPY-GPHC_X5R_4V-to-50V_25.pdf?src-supplier=Digi-Key, ComponentLink1URL=http://www.yageo.com/documents/recent/UPY-GPHC_X5R_4V-to-50V_25.pdf?src-supplier=Digi-Key, Item Type=Capacitor, Manufacturer Part Number=CC0603KRX5R7BB106, Mount="Surface Mount", Packaging="Cut Tape", Pricing 1="1=0.68000, 10=0.48000, 50=0.36300, 100=0.31610, 500=0.23416, 1000=0.19903 (USD)", RoHS=Yes, RoHS Compliant=Yes, Stock 1=240725, Supplier 1=Digi-Key
C32 C33: library part GRM31CR61E476ME44L, "CAP CER 47UF 25V X5R 1206", Dielectric=X5R, LCSC Part Number=C403725, Manufacturer=Murata, Supplier Part Number 1=490-16268-2-ND, Tolerance=20%, Voltage Rating (DC)=25V, Capacitance=47uF, Category="Ceramic Capacitors", ComponentLink1Description=https://search.murata.co.jp/Ceramy/image/img/A01X/partnumbering_e_01.pdf?src-supplier=Digi-Key, ComponentLink1URL=https://search.murata.co.jp/Ceramy/image/img/A01X/partnumbering_e_01.pdf?src-supplier=Digi-Key, Item Type=Capacitor, Length=3.2mm, Manufacturer Part Number=GRM31CR61E476ME44L, RoHS=Yes, Supplier 1=Digi-Key, Thickness=1.6mm, Width=1.6mm
C34: library part CC0603JRNPO9BN180, "CAP CER 18PF 50V C0G/NPO 0603", Case Code (Imperial)=0603, Case Code (Metric)=1608, Dielectric=C0G, Insulation Resistance=100GR, LCSC Part Number=C107040, Manufacturer=Yageo, Max Operating Temperature=125°C, Min Operating Temperature=-55°C, Package Quantity=1, Resistor Type=Ceramic, Supplier Part Number 1=311-1061-6-ND, Temperature Coefficient=30ppm/°C, Tolerance=5%, Voltage Rating=50V, Capacitance=18pF, Case/Package=0603, Category="Ceramic Capacitors", ComponentLink1Description=https://datasheet.ciiva.com/144/mlccorderingcode-144638.pdf?src-supplier=Digi-Key, ComponentLink1URL=https://datasheet.ciiva.com/144/mlccorderingcode-144638.pdf?src-supplier=Digi-Key, ComponentLink2Description=https://datasheet.ciiva.com/144/mlccorderingcode-144637.pdf?src-supplier=Digi-Key, ComponentLink2URL=https://datasheet.ciiva.com/144/mlccorderingcode-144637.pdf?src-supplier=Digi-Key, ComponentLink3Description=https://datasheet.ciiva.com/144/mlccorderingcode-144639.pdf?src-supplier=Digi-Key, ComponentLink3URL=https://datasheet.ciiva.com/144/mlccorderingcode-144639.pdf?src-supplier=Digi-Key, ComponentLink4Description=https://datasheet.ciiva.com/28450/1443161-28450477.pdf?src-supplier=Element14, ComponentLink4URL=https://datasheet.ciiva.com/28450/1443161-28450477.pdf?src-supplier=Element14, ComponentLink5Description=https://datasheet.ciiva.com/46430/1835847-46430152.pdf?src-supplier=Element14, ComponentLink5URL=https://datasheet.ciiva.com/46430/1835847-46430152.pdf?src-supplier=Element14, ComponentLink6Description=https://datasheet.ciiva.com/5425/upy-gp-np0-16v-to-50v-8-5425439.pdf?src-supplier=Mouser, ComponentLink6URL=https://datasheet.ciiva.com/5425/upy-gp-np0-16v-to-50v-8-5425439.pdf?src-supplier=Mouser, ComponentLink7Description=https://datasheet.ciiva.com/8033/1734582-8033733.pdf?src-supplier=Element14, ComponentLink7URL=https://datasheet.ciiva.com/8033/1734582-8033733.pdf?src-supplier=Element14, ComponentLink8Description=https://datasheet.ciiva.com/11587/upy-gp-np0-16v-to-50v-8-11587323.pdf?src-supplier=Avnet, ComponentLink8URL=https://datasheet.ciiva.com/11587/upy-gp-np0-16v-to-50v-8-11587323.pdf?src-supplier=Avnet, Depth=0.8mm, Height=0.8mm, Lead Free="Lead Free", Length=1.6mm, Manufacturer Part Number=CC0603JRNPO9BN180, Mount="Surface Mount", Number of Pins=2, Packaging="Tape and Reel", Pricing 1="1=0.10000, 10=0.04000, 50=0.02200, 100=0.01790, 500=0.01282, 1000=0.01007 (USD)", Radiation Hardening=No, REACH SVHC="No SVHC", RoHS=Yes, RoHS Compliant=Yes, Series=CC, Stock 1=936645, Supplier 1=Digi-Key, Termination=SMD/SMT, Thickness=0.035inch, Voltage Rating (DC)=50V, Width=0.031inch
C35: library part 0402B302K500NT, "50V 3nF 0402 Multilayer Ceramic Capacitors MLCC - SMD/SMT ROHS", LCSC Part Number=C2857967, Manufacturer="FH (Guangdong Fenghua Advanced Tech)", Package=0402, ComponentLink1Description=LCSC, ComponentLink1URL=https://www.lcsc.com/product-detail/Multilayer-Ceramic-Capacitors-MLCC-SMD-SMT_FH-Guangdong-Fenghua-Advanced-Tech-0402B302K500NT_C2857967.html, Item Type=Capacitor, Manufacturer Part Number=0402B302K500NT
C36: library part 0603B682K500NT, "50V 6.8nF X7R ±10% 0603", LCSC Part Number=C1631, Manufacturer=FH, ComponentLink1Description=LCSC, ComponentLink1URL=https://www.lcsc.com/product-detail/Multilayer-Ceramic-Capacitors-MLCC-SMD-SMT_FH-Guangdong-Fenghua-Advanced-Tech-0603B682K500NT_C1631.html, Item Type=Capacitor, Manufacturer Part Number=0603B682K500NT
D1 D2: "0.5mA@40V 40V Single 3A 0.55V@3A SMA(DO-214AC) Schottky Barrier Diodes (SBD) ROHS", LCSC Part Number=C8678, Manufacturer=MDD, Package=SMA(DO-214AC), ComponentLink1Description=LCSC, ComponentLink1URL=https://www.lcsc.com/product-detail/Schottky-Barrier-Diodes-SBD_MDD-Microdiode-Electronics-SS34_C8678.html, Item Type=Diode, Manufacturer Part Number=SS34
D3: "Schottky Barrier Diode SK36, DO-214AB, 3A/60V", Average Rectified Current=3A, Case/Package=SMC, Forward Voltage=750mV, LCSC Part Number=C16015, Manufacturer="ON Semiconductor / Fairchild", Max Forward Surge Current (Ifsm)=100A, Max Operating Temperature=150°C, Max Repetitive Reverse Voltage (Vrrm)=60V, Max Reverse Current=500uA, Min Operating Temperature=-55°C, Package Quantity=3000, Power Dissipation=2.27W, Supplier Part Number 1=9034425P, Category="Schottky Diodes", ComponentLink1Description=https://datasheet.ciiva.com/4714/ss36-197193-4714610.pdf?src-supplier=Mouser, ComponentLink1URL=https://datasheet.ciiva.com/4714/ss36-197193-4714610.pdf?src-supplier=Mouser, ComponentLink2Description=https://datasheet.ciiva.com/16889/ss36-16889545.pdf?src-supplier=Future+Electronics, ComponentLink2URL=https://datasheet.ciiva.com/16889/ss36-16889545.pdf?src-supplier=Future+Electronics, ComponentLink3Description=https://datasheet.ciiva.com/920/ss34-920433.pdf?src-supplier=Digi-Key, ComponentLink3URL=https://datasheet.ciiva.com/920/ss34-920433.pdf?src-supplier=Digi-Key, ComponentLink4Description=https://datasheet.ciiva.com/920/ss34-920434.pdf?src-supplier=Digi-Key, ComponentLink4URL=https://datasheet.ciiva.com/920/ss34-920434.pdf?src-supplier=Digi-Key, ComponentLink5Description=https://datasheet.ciiva.com/920/ss34-920435.pdf?src-supplier=Digi-Key, ComponentLink5URL=https://datasheet.ciiva.com/920/ss34-920435.pdf?src-supplier=Digi-Key, Current=3A, Current Rating=3A, Element Configuration=Single, Forward Current=3A, Item Type=Diode, Lead Free="Lead Free", Manufacturer Part Number=SS36, Max Reverse Leakage Current=500uA, Max Reverse Voltage (DC)=60V, Max Surge Current=100A, Mount="Surface Mount", Number of Pins=2, Output Current=3A, Packaging="Tape and Reel", Peak Non-Repetitive Surge Current=100A, Polarity=Standard, Pricing 1="100=0.43800, 500=0.34200, 1000=0.27800, 3000=0.25000 (GBP)", Radiation Hardening=No, Reach SVHC Compliant=Yes, RoHS=Yes, RoHS Compliant=Yes, Series=-, Stock 1=100, Supplier 1=Rs, Voltage=60V, Voltage Rating (DC)=60V
FB1: "FERRITE BEAD 120 OHM 0402 1LN", Case Code (Imperial)=0402, Case Code (Metric)=1005, Current Rating=1.3A, DC Resistance (DCR)=90mR, LCSC Part Number=C76891, Manufacturer=Murata, Max Operating Temperature=125°C, Min Operating Temperature=-55°C, Package Quantity=1, Test Frequency=100MHz, Tolerance=25%, Case/Package=0402, Category="Ferrite Beads and Chips", ComponentLink1Description=https://datasheet.ciiva.com/11800/0900766b811b5866-11800860.pdf?src-supplier=RSComponents, ComponentLink1URL=https://datasheet.ciiva.com/11800/0900766b811b5866-11800860.pdf?src-supplier=RSComponents, ComponentLink2Description=https://datasheet.ciiva.com/18093/getdatasheetpartid-195858-18093157.pdf?src-supplier=Verical, ComponentLink2URL=https://datasheet.ciiva.com/18093/getdatasheetpartid-195858-18093157.pdf?src-supplier=Verical, ComponentLink3Description=https://datasheet.ciiva.com/41425/001171686-da-01-en-chip-drossel0402-120r-1300ma-1-0x0-5mm-41425776.pdf?src-supplier=Conrad, ComponentLink3URL=https://datasheet.ciiva.com/41425/001171686-da-01-en-chip-drossel0402-120r-1300ma-1-0x0-5mm-41425776.pdf?src-supplier=Conrad, ComponentLink4Description=https://datasheet.ciiva.com/41449/001172205-da-01-en-drossel-0402-120r-11-0x0-5mm-10000st-41449495.pdf?src-supplier=Conrad, ComponentLink4URL=https://datasheet.ciiva.com/41449/001172205-da-01-en-drossel-0402-120r-11-0x0-5mm-10000st-41449495.pdf?src-supplier=Conrad, ComponentLink5Description=https://datasheet.ciiva.com/1012/l0110e-1012435.pdf?src-supplier=Digi-Key, ComponentLink5URL=https://datasheet.ciiva.com/1012/l0110e-1012435.pdf?src-supplier=Digi-Key, ComponentLink6Description=https://datasheet.ciiva.com/1012/l0110e-1012434.pdf?src-supplier=Digi-Key, ComponentLink6URL=https://datasheet.ciiva.com/1012/l0110e-1012434.pdf?src-supplier=Digi-Key, ComponentLink7Description=https://datasheet.ciiva.com/1012/l0110e-1012436.pdf?src-supplier=Digi-Key, ComponentLink7URL=https://datasheet.ciiva.com/1012/l0110e-1012436.pdf?src-supplier=Digi-Key, Core Material=Ferrite, DC Current=1.3A, DC Resistance-Max=90mR, Depth=0.55mm, Height=0.5mm, Impedance=120R, Item Type="Ferrite Bead", Lead Free="Lead Free", Length=1mm, Manufacturer Part Number=BLM15PD121SN1D, Material=Steel,Ferrite, Max Current Rating=1.3A, Max DC Current=1.3A, Military Standard=Not, Number of Circuits=1, Number of Lines=1, Number of Pins=2, Packaging="Tape and Reel", Pricing 1="10000=0.03238, 20000=0.03063, 40000=0.02888, 60000=0.02713, 80000=0.02538, 100000=0.02363, 1000000=0.02188 (USD)", Radiation Hardening=No, Reach SVHC Compliant=Yes, RoHS=Yes, RoHS Compliant=Yes, Series=BLM15PD, Stock 1=300000, Supplier 1=Avnet, Supplier Part Number 1=BLM15PD121SN1D, Termination=SMD/SMT, Width=0.5mm
J1 J3: "CONN HEADER SMD R/A 6POS 2MM", Color=White, Contact Resistance=20mR, Current Rating=2A, Flammability Rating="UL94 V-0", Housing Color=Beige, Insulation Color=Natural, Insulation Resistance=1GR, LCSC Part Number=C265405, Manufacturer=JST, Max Operating Temperature=85°C, Max Voltage Rating (AC)=100V, Min Operating Temperature=-25°C, Supplier Part Number 1=6881369P, Category=Connectors, ComponentLink1Description=https://datasheet.ciiva.com/11747/0900766b80df0d9d-11747278.pdf?src-supplier=Rs, ComponentLink1URL=https://datasheet.ciiva.com/11747/0900766b80df0d9d-11747278.pdf?src-supplier=Rs, ComponentLink2Description=https://datasheet.ciiva.com/8052/1699381-8052221.pdf?src-supplier=Element14, ComponentLink2URL=https://datasheet.ciiva.com/8052/1699381-8052221.pdf?src-supplier=Element14, ComponentLink3Description=https://datasheet.ciiva.com/712/eph-712622.pdf?src-supplier=Digi-Key, ComponentLink3URL=https://datasheet.ciiva.com/712/eph-712622.pdf?src-supplier=Digi-Key, ComponentLink4Description=https://datasheet.ciiva.com/712/eph-712623.pdf?src-supplier=Digi-Key, ComponentLink4URL=https://datasheet.ciiva.com/712/eph-712623.pdf?src-supplier=Digi-Key, ComponentLink5Description=https://datasheet.ciiva.com/730/eph-730589.pdf?src-supplier=Digi-Key, ComponentLink5URL=https://datasheet.ciiva.com/730/eph-730589.pdf?src-supplier=Digi-Key, ComponentLink6Description=https://datasheet.ciiva.com/16340/jsts6b-ph-sm4-tb-lf-sn-16340154.pdf?src-supplier=Future+Electronics, ComponentLink6URL=https://datasheet.ciiva.com/16340/jsts6b-ph-sm4-tb-lf-sn-16340154.pdf?src-supplier=Future+Electronics, Connector Type=Header, Contact Finish - Mating=TIN, Contact Material="Copper Alloy,Tin,Bronze,Brass", Contact Mating Length=0.13inch, Contact Plating=Tin,Copper, Contact Shape=Square, Contact Type="Male Pin", Depth=7.6mm, Fastening Type=Detent, Gender=Male, Height=9.4mm, Housing Material=Polyamide, Insulation Material=Nylon, Item Type="JST Connector", Lead Free="Lead Free", Lead Pitch=2mm, Length=15.9mm, Manufacturer Part Number=S6B-PH-SM4-TB(LF)(SN), Max Current Rating=2A, Max Voltage Rating (DC)=100V, Mounting Technology="Surface Mount", Number Of Contacts=6, Number of Poles=6, Number of Positions=6, Number of Rows=1, Orientation="Right Angle", Packaging="Tape and Reel", Pitch=2mm, Pricing 1="125=0.16040, 500=0.65000, 2500=0.61200, 5000=0.58600 (GBP)", Reach SVHC Compliant=Yes, RoHS=Yes, Series=PH, Stock 1=8280, Supplier 1=Rs, Termination=Solder, Voltage Rating=100V, Voltage Rating (AC)=100V, Width=5mm, Working Voltage=100V
J2: "CONN HEADER VERT 4POS 2MM", LCSC Part Number=C574333, Manufacturer="TE Connectivity", Supplier Part Number 1=7202004P, Category="Headers and Wire Housings", ComponentLink1Description=https://datasheet.ciiva.com/30492/0900766b80f980a5-30492744.pdf?src-supplier=Rs, ComponentLink1URL=https://datasheet.ciiva.com/30492/0900766b80f980a5-30492744.pdf?src-supplier=Rs, ComponentLink2Description=https://datasheet.ciiva.com/34397/4400544-34397340.pdf?src-supplier=Onlinecomponents.com, ComponentLink2URL=https://datasheet.ciiva.com/34397/4400544-34397340.pdf?src-supplier=Onlinecomponents.com, ComponentLink3Description=https://datasheet.ciiva.com/732/eng-cd-440054-e2-732490.pdf?src-supplier=Digi-Key, ComponentLink3URL=https://datasheet.ciiva.com/732/eng-cd-440054-e2-732490.pdf?src-supplier=Digi-Key, Item Type="JST Connector", Manufacturer Part Number=440054-4, Pricing 1="10=0.02240 (GBP)", RoHS=Yes, Stock 1=3450, Supplier 1=Rs
J4 J5: "0.5 FPC ZIF HSG ASSY 5CKT EMBSTP", Current Rating=500mA, Manufacturer=Molex, Package Quantity=3000, Supplier Part Number 1=538-54548-0571, Voltage Rating=50V, Category="FFC / FPC", ComponentLink1Description=https://datasheet.ciiva.com/5137/0545480571-ffc-fpc-connectors-228778-5137871.pdf?src-supplier=Mouser, ComponentLink1URL=https://datasheet.ciiva.com/5137/0545480571-ffc-fpc-connectors-228778-5137871.pdf?src-supplier=Mouser, Contact Material=Bronze, Contact Plating=Gold, ELV=Compliant, Gender=Female, Housing Material=Thermoplastic, Item Type="FPC Connector", Manufacturer Part Number=54548-0571, Material=Bronze, Number of Circuits=5, Number Of Contacts=5, Number of Positions=5, Number of Rows=1, Orientation="Right Angle", Packaging="Tape and Reel", Pitch=0.5mm, Pricing 1="1=1.26000, 10=1.04000, 50=1.04000, 100=0.86300, 1000=0.69000, 10000=0.58700 (USD)", Radiation Hardening=No, Reach SVHC Compliant=Yes, RoHS=Yes, RoHS Compliant=Yes, Series=54548, Stackable=No, Stock 1=15599, Supplier 1=Mouser, Termination=SMD/SMT
J6: "Slide Lock -25℃~+85℃ 6 Double-sided contacts/up and down connection Surface Mount 0.5mm SMD,P=0.5mm FFC/FPC Connectors ROHS", LCSC Part Number=C2858296, Manufacturer="SHOU HAN", Package=SMD,P=0.5mm, ComponentLink1Description=LCSC, ComponentLink1URL=https://www.lcsc.com/product-detail/FFC-span-style-background-color-ff0-FPC-span-Connectors_SHOU-HAN-0-5-6PQFHY-H1-0-119_C2858296.html, Item Type=Connector, Manufacturer Part Number="0.5-6PQFHY-H1.0 119"
J7: "1x2P 1 2mm Male pin 2 -25℃~+85℃ 2A Surface Mount SMD,P=2mm Wire To Board / Wire To Wire Connector ROHS", LCSC Part Number=C3029440, Manufacturer=XUNPU, Package=SMD,P=2mm, ComponentLink1Description=LCSC, ComponentLink1URL=https://www.lcsc.com/product-detail/Wire-To-Board-Wire-To-Wire-Connector_XUNPU-WAFER-PH2-0-2PWB_C3029440.html, Item Type="Right Angle JST", Manufacturer Part Number=WAFER-PH2.0-2PWB
J8: "CONN HEADER SMD 2POS 1.25MM", Color=Natural, Contact Resistance=20mR, Current Rating=1A, Flammability Rating="UL94 V-0", Insulation Resistance=100MR, LCSC Part Number=C122410, Manufacturer=Molex, Manufacturer Part Number=53398-0271, Max Operating Temperature=85°C, Min Operating Temperature=-40°C, Package Quantity=1000, Supplier Part Number 1=538-53398-0271, Voltage Rating=125V, Category="Headers and Wire Housings", ComponentLink1Description=https://datasheet.ciiva.com/30229/225140533980271-pcb-headers-30229043.pdf?src-supplier=Onlinecomponents.com, ComponentLink1URL=https://datasheet.ciiva.com/30229/225140533980271-pcb-headers-30229043.pdf?src-supplier=Onlinecomponents.com, Contact Material=Bronze,Brass,Tin, Contact Plating=Tin, Contact Type="Blade Pin", Gender=Male, Glow Wire Compliant=Non-compliant, Housing Color=Natural, Housing Material=Nylon, Item Type="JST Connector", Lead Free="Lead Free", Mounting Technology="Surface Mount", Number of Circuits=2, Number Of Contacts=2, Number of Positions=2, Number of Rows=1, Orientation=Vertical, Packaging="Tape and Reel", Pitch=1.25mm, Pricing 1="1=0.62000, 10=0.52100, 50=0.52100, 100=0.40500, 1000=0.31000, 10000=0.25800 (USD)", Radiation Hardening=No, Reach SVHC Compliant=Unknown, RoHS=Yes, RoHS Compliant=Yes, Series=PicoBlade, Stock 1=64394, Supplier 1=Mouser, Termination=Solder, Voltage Rating (AC)=125V, Voltage Rating (DC)=125V, Working Voltage=125V
J11: "CONN FPC BOTTOM 25POS 0.3MM R/A", LCSC Part Number=C2904698, Manufacturer=Hirose, Supplier Part Number 1=6089120, Category="FFC / FPC", ComponentLink1Description=https://www.hirose.com/product/en/download_file/key_name/FH26/category/Catalog/doc_file_id/49355/?file_category_id=4&item_id=298&is_series=1&src-supplier=Digi-Key, ComponentLink1URL=https://www.hirose.com/product/en/download_file/key_name/FH26/category/Catalog/doc_file_id/49355/?file_category_id=4&item_id=298&is_series=1&src-supplier=Digi-Key, ComponentLink2Description=https://www.hirose.com/product/download/?distributor=digikey&amp;type=2d&amp;lang=en&amp;num=FH26W-13S-0.3SHW(60)&src-supplier=Digi-Key, ComponentLink2URL=https://www.hirose.com/product/download/?distributor=digikey&amp;type=2d&amp;lang=en&amp;num=FH26W-13S-0.3SHW(60)&src-supplier=Digi-Key, ComponentLink3Description=https://www.hirose.com/product/download/?distributor=digikey&amp;type=specSheet&amp;lang=en&amp;num=FH26W-25S-0.3SHW(60)&src-supplier=Digi-Key, ComponentLink3URL=https://www.hirose.com/product/download/?distributor=digikey&amp;type=specSheet&amp;lang=en&amp;num=FH26W-25S-0.3SHW(60)&src-supplier=Digi-Key, Item Type="FPC Connector", Manufacturer Part Number=FH26W-25S-0.3SHW(60), Pricing 1="5000=0.85500 (USD)", RoHS=Yes, Stock 1=5000, Supplier 1="Future Electronics"